# Altium PCB Vela IF820, Integrated Antenna_PCB_Footprint_Altium.PcbDoc
Units mm, origin at the board's own origin, x right, y up, seen from the top; angles counter-clockwise.
Board outline 9.3 x 12.5 mm, 2 copper layers (Top Layer, Bottom Layer); 1 components, 0 nets, 54 pads, 0 vias.
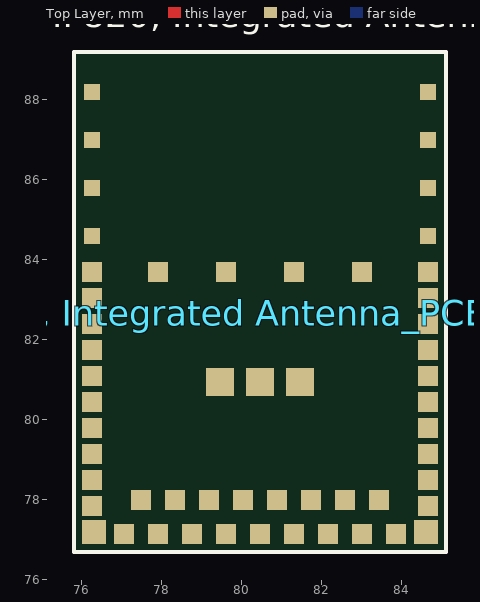
[diagram p0: Top Layer view]
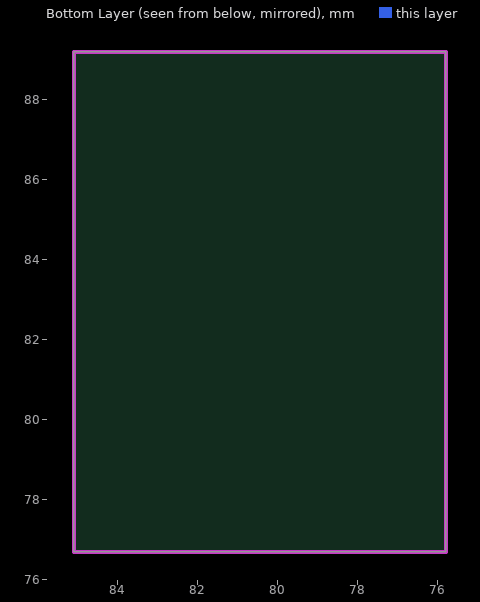
[diagram p1: Bottom Layer view, seen from below]

## Layer stack, top to bottom
Top Solder: solder mask 0.0102, Solder Resist, Dk 3.5
Top Layer: signal copper 0.0356
Dielectric 1: dielectric 0.32, FR-4, Dk 4.8
Bottom Layer: signal copper 0.0356
Bottom Solder: solder mask 0.0102, Solder Resist, Dk 3.5

## Board outline
75.796,76.693 75.796,89.193 85.096,89.193 85.096,76.693

## Design rules (kind name [scope] priority, off if disabled: settings)
Clearance [All] p1: gap=0.254 ignorepadtopadclearanceinfootprint=FALSE except(0: Arc-Hole Track-Hole SMDPad-Hole THPad-Hole Via-Hole Fill-Hole Poly-Hole Region-Hole Text-Hole)
PolygonConnect [All] p1: connectstyle=Relief reliefconductorwidth=0.254 reliefentries=4 polygonreliefangle="90 Angle" airgapwidth=0.254
RoutingVias [All] p1: holewidth=0.711 width=1.27 viastyle="Through Hole" minholewidth=0.711 minwidth=1.27 maxholewidth=0.711 maxwidth=1.27
SolderMaskExpansion [All] p1: expansion=0.102 istentingtop=FALSE
Width [All] p1: maxlimit=0.254 minlimit=0.254 preferedwidth=0.254
30 further rules are at their usual default settings.

## Components (designator, comment, footprint, x,y, rotation, side; value= is the part's Value field where it differs from the comment)
"Vela IF820, Integrated Antenna_PCB_Footprint" "Comment" "Laird, Vela IF820-SA, Platform Side" 80.446,82.668 r270 top locked

## Footprints (in the part's own frame and the unit in brackets; to place one, negate y for a bottom-side part, rotate by r counter-clockwise, add the part's x,y. Pads: shape width x height; smd on the part's side, far side on the other; paste and mask are expansions set on the pad)
"Laird, Vela IF820-SA, Platform Side" [mm] "Laird, Vela IF820-SA, 9.3mm x 12.5mm"
  rect 0.5x0.5 smd paste-0.05 mask-0.05: 1(-1.025,-4.2) 2(-0.375,-4.2) 3(0.275,-4.2) 4(0.925,-4.2) 5(1.575,-4.2) 6(2.225,-4.2) 7(2.875,-4.2) 8(3.525,-4.2) 9(4.175,-4.2) 10(4.825,-4.2) 11(5.525,-3.4) 12(5.525,-2.55) 13(5.525,-1.7) 14(5.525,-0.85) 15(5.525,0) 16(5.525,0.85) 17(5.525,1.7) 18(5.525,2.55) 19(5.525,3.4) 20(4.825,4.2) 21(4.175,4.2) 22(3.525,4.2) 23(2.875,4.2) 24(2.225,4.2) 25(1.575,4.2) 26(0.925,4.2) 27(0.275,4.2) 28(-0.375,4.2) 29(-1.025,4.2) 30(4.675,-2.975) 31(4.675,-2.125) 32(4.675,-1.275) 33(4.675,-0.425) 34(4.675,0.425) 35(4.675,1.275) 36(4.675,2.125) 37(4.675,2.975) 40(-1.025,-2.55) 41(-1.025,-0.85) 42(-1.025,0.85) 43(-1.025,2.55)
  rect 0.6x0.6 smd paste-0.05 mask-0.05: 38(5.475,-4.15) 39(5.475,4.15)
  rect 0.4x0.4 smd paste-0.05 mask-0.05: 44(-5.525,-4.2) 45(-4.325,-4.2) 46(-3.125,-4.2) 47(-1.925,-4.2) 48(-5.525,4.2) 49(-4.325,4.2) 50(-3.125,4.2) 51(-1.925,4.2)
  rect 0.702x0.702 smd paste-0.051 mask-0.051: 52(1.725,-1) 53(1.725,0) 54(1.725,1)
  silkscreen extent -6.52,-4.65 5.98,4.65, body extent -5.68,-4.4 5.73,4.4, height 0.01

## Nets (pads, with @x,y where several pads share a name; then routed paths per layer and width w, separated by ;. In a path a pad name is that pad's centre, name@x,y a point inside that pad or via, vN(x,y) a via of type N, cw(c..) or ccw(c..) an arc to the next point about the centre after c; other vN are vias at no path point)
pads on no net: "Vela IF820, Integrated Antenna_PCB_Footprint.1" "Vela IF820, Integrated Antenna_PCB_Footprint.2" "Vela IF820, Integrated Antenna_PCB_Footprint.3" "Vela IF820, Integrated Antenna_PCB_Footprint.4" "Vela IF820, Integrated Antenna_PCB_Footprint.5" "Vela IF820, Integrated Antenna_PCB_Footprint.6" "Vela IF820, Integrated Antenna_PCB_Footprint.7" "Vela IF820, Integrated Antenna_PCB_Footprint.8" "Vela IF820, Integrated Antenna_PCB_Footprint.9" "Vela IF820, Integrated Antenna_PCB_Footprint.10" "Vela IF820, Integrated Antenna_PCB_Footprint.11" "Vela IF820, Integrated Antenna_PCB_Footprint.12" "Vela IF820, Integrated Antenna_PCB_Footprint.13" "Vela IF820, Integrated Antenna_PCB_Footprint.14" "Vela IF820, Integrated Antenna_PCB_Footprint.15" "Vela IF820, Integrated Antenna_PCB_Footprint.16" "Vela IF820, Integrated Antenna_PCB_Footprint.17" "Vela IF820, Integrated Antenna_PCB_Footprint.18" "Vela IF820, Integrated Antenna_PCB_Footprint.19" "Vela IF820, Integrated Antenna_PCB_Footprint.20" "Vela IF820, Integrated Antenna_PCB_Footprint.21" "Vela IF820, Integrated Antenna_PCB_Footprint.22" "Vela IF820, Integrated Antenna_PCB_Footprint.23" "Vela IF820, Integrated Antenna_PCB_Footprint.24" "Vela IF820, Integrated Antenna_PCB_Footprint.25" "Vela IF820, Integrated Antenna_PCB_Footprint.26" "Vela IF820, Integrated Antenna_PCB_Footprint.27" "Vela IF820, Integrated Antenna_PCB_Footprint.28" "Vela IF820, Integrated Antenna_PCB_Footprint.29" "Vela IF820, Integrated Antenna_PCB_Footprint.30" "Vela IF820, Integrated Antenna_PCB_Footprint.31" "Vela IF820, Integrated Antenna_PCB_Footprint.32" "Vela IF820, Integrated Antenna_PCB_Footprint.33" "Vela IF820, Integrated Antenna_PCB_Footprint.34" "Vela IF820, Integrated Antenna_PCB_Footprint.35" "Vela IF820, Integrated Antenna_PCB_Footprint.36" "Vela IF820, Integrated Antenna_PCB_Footprint.37" "Vela IF820, Integrated Antenna_PCB_Footprint.38" "Vela IF820, Integrated Antenna_PCB_Footprint.39" "Vela IF820, Integrated Antenna_PCB_Footprint.40" "Vela IF820, Integrated Antenna_PCB_Footprint.41" "Vela IF820, Integrated Antenna_PCB_Footprint.42" "Vela IF820, Integrated Antenna_PCB_Footprint.43" "Vela IF820, Integrated Antenna_PCB_Footprint.44" "Vela IF820, Integrated Antenna_PCB_Footprint.45" "Vela IF820, Integrated Antenna_PCB_Footprint.46" "Vela IF820, Integrated Antenna_PCB_Footprint.47" "Vela IF820, Integrated Antenna_PCB_Footprint.48" "Vela IF820, Integrated Antenna_PCB_Footprint.49" "Vela IF820, Integrated Antenna_PCB_Footprint.50" "Vela IF820, Integrated Antenna_PCB_Footprint.51" "Vela IF820, Integrated Antenna_PCB_Footprint.52" "Vela IF820, Integrated Antenna_PCB_Footprint.53" "Vela IF820, Integrated Antenna_PCB_Footprint.54"

## Keep-outs
Keep-Out Layer:
  the board outline again, w0.102

## Silkscreen, mask and mechanical layers (free items; w line width, h text height)
Mechanical 1:
  lines w0.051: 76.445,84.193 76.445,89.193 84.445,89.193 84.445,84.193 76.445,84.193
  text "Keep Out  / Area" at 77.756,85.661 h0.8

## Text inside footprints (layer, text, board x,y; h text height)
"Vela IF820, Integrated Antenna_PCB_Footprint": Top Assembly "*" at 75.673,83.511 h0.8 r270